# Altium PCB 60ghz radar_v1.1.PcbDoc (part 2 of 2)
Units mil, origin at the board's own origin, x right, y up, seen from the top; angles counter-clockwise.
Board outline 1181.1 x 787.4 mil, 4 copper layers (Top Layer, Mid Layer 1, Mid Layer 2, Bottom Layer), stack 61.811 mil thick; 64 components, 52 nets, 281 pads, 70 vias.
Unrouted connection lines stored in the file: 1.
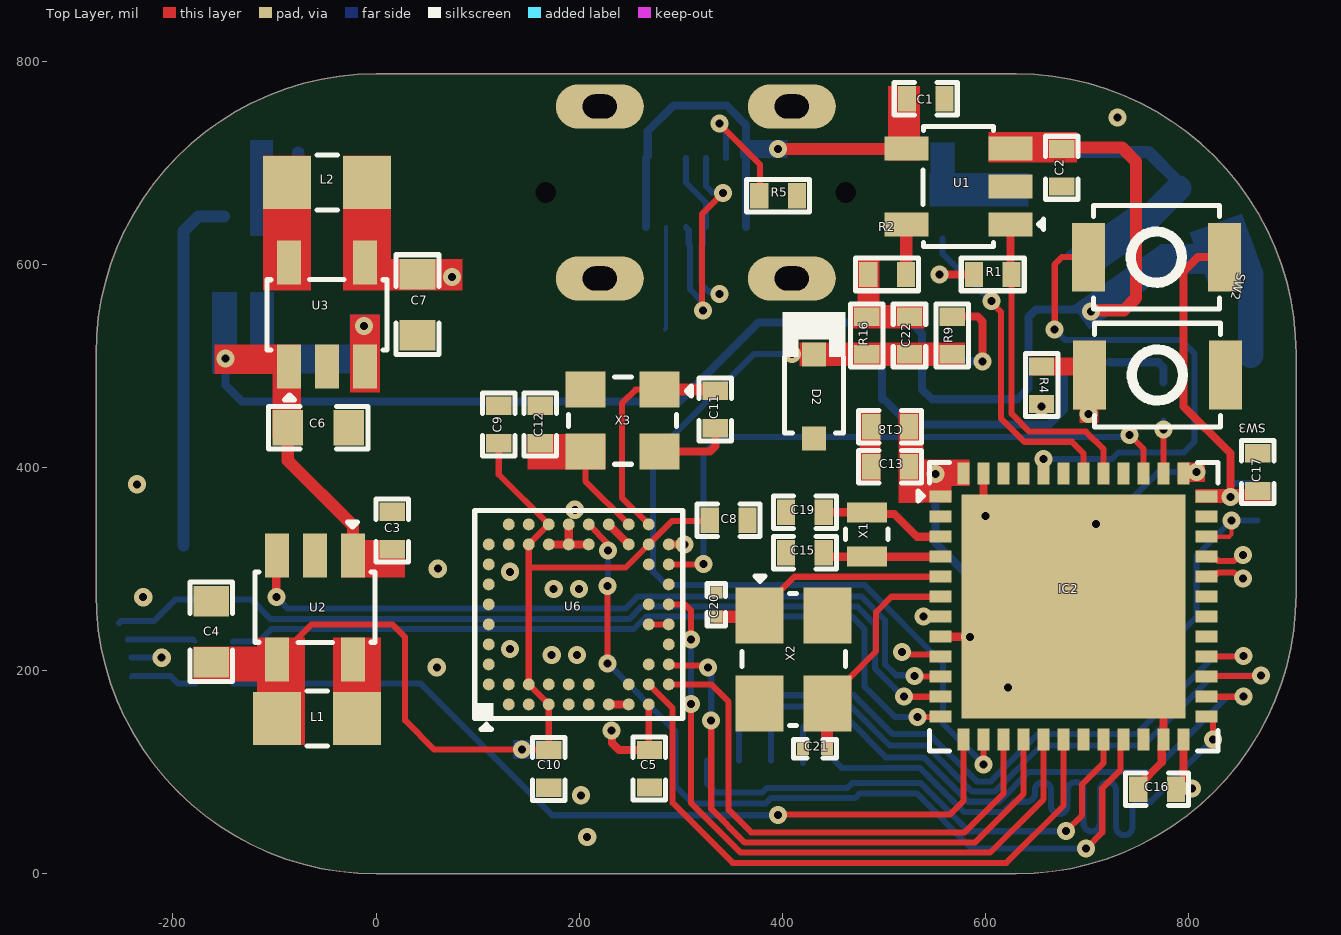
[diagram p0: Top Layer view]

## Part data (continued)
SW1: "SWITCH TACTILE SPST-NO 0.05A 12V", Actuator Color=Black, Case/Package=SMD/SMT, Contact Current Rating=50mA, Contact Resistance=500mR, LCSC Part Number=C79167, Manufacturer=Panasonic, Max Operating Temperature=70°C, Max Voltage Rating (DC)=12V, Min Operating Temperature=-20°C, Operating Force=2.2N, Package Quantity=5000, Supplier Part Number=667-EVQP7A01P, Actuator Length=0.65mm, Category="Tactile Switches", ComponentLink1Description=http://uk.rs-online.com/webdocs/13a5/0900766b813a5dbe.pdf?src-supplier=Rs, ComponentLink1URL=http://uk.rs-online.com/webdocs/13a5/0900766b813a5dbe.pdf?src-supplier=Rs, ComponentLink2Description=http://datasheet.octopart.com/EVQ-P7A01P-Panasonic-datasheet-98950114.pdf?src-supplier=Rs, ComponentLink2URL=http://datasheet.octopart.com/EVQ-P7A01P-Panasonic-datasheet-98950114.pdf?src-supplier=Rs, ComponentLink3Description=https://www3.panasonic.biz/ac/e_download/control/switch/light-touch/catalog/sw_lt_eng_3529s_side.pdf?src-supplier=Verical, ComponentLink3URL=https://www3.panasonic.biz/ac/e_download/control/switch/light-touch/catalog/sw_lt_eng_3529s_side.pdf?src-supplier=Verical, ComponentLink4Description=https://www3.panasonic.biz/ac/e_download/control/switch/light-touch/catalog/sw_lt_eng_3529s_side.pdf?src-supplier=Onlinecomponents.com, ComponentLink4URL=https://www3.panasonic.biz/ac/e_download/control/switch/light-touch/catalog/sw_lt_eng_3529s_side.pdf?src-supplier=Onlinecomponents.com, ComponentLink5Description=https://www3.panasonic.biz/ac/e_download/control/switch/light-touch/catalog/sw_lt_eng_3529s_side.pdf?src-supplier=Arrow+Electronics, ComponentLink5URL=https://www3.panasonic.biz/ac/e_download/control/switch/light-touch/catalog/sw_lt_eng_3529s_side.pdf?src-supplier=Arrow+Electronics, ComponentLink6Description=https://www3.panasonic.biz/ac/e_download/control/switch/light-touch/catalog/sw_lt_eng_3529s_side.pdf?src-supplier=Avnet, ComponentLink6URL=https://www3.panasonic.biz/ac/e_download/control/switch/light-touch/catalog/sw_lt_eng_3529s_side.pdf?src-supplier=Avnet, ComponentLink7Description=http://www.farnell.com/datasheets/1790605.pdf?src-supplier=Newark, ComponentLink7URL=http://www.farnell.com/datasheets/1790605.pdf?src-supplier=Newark, ComponentLink8Description=https://datasheet.octopart.com/EVQ-P7A01P-Panasonic-datasheet-98950114.pdf?src-supplier=Future+Electronics, ComponentLink8URL=https://datasheet.octopart.com/EVQ-P7A01P-Panasonic-datasheet-98950114.pdf?src-supplier=Future+Electronics, ComponentLink9Description=https://www3.panasonic.biz/ac/e_download/control/switch/light-touch/catalog/sw_lt_eng_3529s_side.pdf?src-supplier=Mouser, ComponentLink9URL=https://www3.panasonic.biz/ac/e_download/control/switch/light-touch/catalog/sw_lt_eng_3529s_side.pdf?src-supplier=Mouser, ComponentLink10Description=https://www3.panasonic.biz/ac/e_download/control/switch/light-touch/catalog/sw_lt_eng_3529s_side.pdf?src-supplier=Allied+Electronics, ComponentLink10URL=https://www3.panasonic.biz/ac/e_download/control/switch/light-touch/catalog/sw_lt_eng_3529s_side.pdf?src-supplier=Allied+Electronics, ComponentLink11Description=http://datasheet.octopart.com/EVQ-P7A01P-Panasonic-datasheet-98950114.pdf?src-supplier=Future+Electronics, ComponentLink11URL=http://datasheet.octopart.com/EVQ-P7A01P-Panasonic-datasheet-98950114.pdf?src-supplier=Future+Electronics, ComponentLink12Description=http://datasheet.octopart.com/EVQ-P7A01P-Panasonic-datasheet-98950114.pdf?src-supplier=Distrelec, ComponentLink12URL=http://datasheet.octopart.com/EVQ-P7A01P-Panasonic-datasheet-98950114.pdf?src-supplier=Distrelec, ComponentLink13Description=http://datasheet.octopart.com/EVQ-P7A01P-Panasonic-datasheet-98950114.pdf?src-supplier=Farnell, ComponentLink13URL=http://datasheet.octopart.com/EVQ-P7A01P-Panasonic-datasheet-98950114.pdf?src-supplier=Farnell, ComponentLink14Description=http://www.farnell.com/datasheets/1790605.pdf?src-supplier=Element14, ComponentLink14URL=http://www.farnell.com/datasheets/1790605.pdf?src-supplier=Element14, ComponentLink15Description=http://industrial.panasonic.com/www-data/pdf/ATK0000/ATK0000CE20.pdf?src-supplier=Farnell, ComponentLink15URL=http://industrial.panasonic.com/www-data/pdf/ATK0000/ATK0000CE20.pdf?src-supplier=Farnell, ComponentLink16Description=http://datasheet.octopart.com/EVQ-P7A01P-Panasonic-datasheet-98950114.pdf?src-supplier=Newark, ComponentLink16URL=http://datasheet.octopart.com/EVQ-P7A01P-Panasonic-datasheet-98950114.pdf?src-supplier=Newark, ComponentLink17Description=https://datasheet.octopart.com/EVQ-P7A01P-Panasonic-datasheet-22087671.pdf?src-supplier=Electro+Sonic, ComponentLink17URL=https://datasheet.octopart.com/EVQ-P7A01P-Panasonic-datasheet-22087671.pdf?src-supplier=Electro+Sonic, ComponentLink18Description=http://datasheet.octopart.com/EVQ-P7A01P-Panasonic-datasheet-98950114.pdf?src-supplier=Quest, ComponentLink18URL=http://datasheet.octopart.com/EVQ-P7A01P-Panasonic-datasheet-98950114.pdf?src-supplier=Quest, ComponentLink19Description=https://www3.panasonic.biz/ac/e_download/control/switch/light-touch/catalog/sw_lt_eng_3529s_side.pdf?src-supplier=TTI, ComponentLink19URL=https://www3.panasonic.biz/ac/e_download/control/switch/light-touch/catalog/sw_lt_eng_3529s_side.pdf?src-supplier=TTI, ComponentLink20Description=https://www3.panasonic.biz/ac/e_download/control/switch/light-touch/catalog/sw_lt_eng_3529s_side.pdf?src-supplier=NAC+Semi, ComponentLink20URL=https://www3.panasonic.biz/ac/e_download/control/switch/light-touch/catalog/sw_lt_eng_3529s_side.pdf?src-supplier=NAC+Semi, Electrical Life=100000Cycles, Illumination Type=Non-Illuminated, Item Type="Tactile Switch", Lead Free="Lead Free", Manufacturer Part Number=EVQ-P7A01P, Mechanical Life=100000Cycles, Mounting Technology="Surface Mount", Orientation="Right Angle", Packaging="Tape and Reel", Pricing="1=0.28, 10=0.258, 50=0.258, 100=0.213, 1000=0.169, 10000=0.133 (USD)", Radiation Hardening=No, Reach SVHC Compliant=Unknown, RoHS=Yes, Series=EVQP7, Stock=47904, Supplier=Mouser, Switch Function=Off-Mom, Switch Travel=0.2mm, Termination="Gull Wing", Throw Configuration=SPST
SW2 SW3: "SWITCH TACTILE SPST-NO 0.05A 12V", Contact Current Rating=50mA, Contact Resistance=100mR, Insulation Resistance=100MR, LCSC Part Number=C231329, Manufacturer=Omron, Max Operating Temperature=70°C, Max Voltage Rating (DC)=12V, Min Operating Temperature=-25°C, Operating Force=1.5N, Package Quantity=1, Ratings="Dust Proof,IP40", Supplier Part Number 1=SW1020DKR-ND, Actuator Length=0.4mm, Actuator Type=Standard, ComponentLink1Description=http://www.farnell.com/datasheets/60838.pdf?src-supplier=Farnell, ComponentLink1URL=http://www.farnell.com/datasheets/60838.pdf?src-supplier=Farnell, ComponentLink2Description=http://www.farnell.com/datasheets/60838.pdf?src-supplier=Element14, ComponentLink2URL=http://www.farnell.com/datasheets/60838.pdf?src-supplier=Element14, ComponentLink3Description=https://omronfs.omron.com/en_US/ecb/products/pdf/en-b3u.pdf?src-supplier=Digi-Key, ComponentLink3URL=https://omronfs.omron.com/en_US/ecb/products/pdf/en-b3u.pdf?src-supplier=Digi-Key, ComponentLink4Description=http://www.omron.com/ecb/products/pdf/en-b3u.pdf?src-supplier=Digi-Key, ComponentLink4URL=http://www.omron.com/ecb/products/pdf/en-b3u.pdf?src-supplier=Digi-Key, ComponentLink5Description=https://www.distrelec.biz/Web/Downloads/he/et/B3U_eng_datasheet.pdf?mime=application%2Fpdf&src-supplier=Distrelec, ComponentLink5URL=https://www.distrelec.biz/Web/Downloads/he/et/B3U_eng_datasheet.pdf?mime=application%2Fpdf&src-supplier=Distrelec, ComponentLink6Description=http://www.onlinecomponents.com/productFiles/mf-OM/en-b3u.pdf?src-supplier=Onlinecomponents.com, ComponentLink6URL=http://www.onlinecomponents.com/productFiles/mf-OM/en-b3u.pdf?src-supplier=Onlinecomponents.com, ComponentLink7Description=https://www.verical.com/server-webapp/html/getDatasheet?partID=552554&src-supplier=Verical, ComponentLink7URL=https://www.verical.com/server-webapp/html/getDatasheet?partID=552554&src-supplier=Verical, ComponentLink8Description=http://www.farnell.com/datasheets/1685550.pdf?src-supplier=Element14, ComponentLink8URL=http://www.farnell.com/datasheets/1685550.pdf?src-supplier=Element14, ComponentLink9Description=http://www.farnell.com/datasheets/2610940.pdf?src-supplier=Farnell, ComponentLink9URL=http://www.farnell.com/datasheets/2610940.pdf?src-supplier=Farnell, ComponentLink10Description=https://www.alliedelec.com/m/d/4c8a9ef82804fc3c241a13c1e298fd73.pdf?src-supplier=Allied+Electronics, ComponentLink10URL=https://www.alliedelec.com/m/d/4c8a9ef82804fc3c241a13c1e298fd73.pdf?src-supplier=Allied+Electronics, Contact Material=Silver, Current Rating=50mA, Depth=2.5mm, Electrical Life=200000Cycles, Height=1.2mm, Illumination Type=Non-Illuminated,Illuminated, Item Type=Switch, Lead Free="Lead Free", Length=4mm, Manufacturer Part Number=B3U-1000P, Max Current Rating=50mA, Mechanical Life=200000Cycles, Mount="Surface Mount", Orientation=Straight, Packaging="Tape and Reel", Pricing 1="1=1, 10=0.961, 25=0.9064, 50=0.7976, 100=0.7251, 250=0.68888, 500=0.67074, 1000=0.52571 (USD)", REACH SVHC=Unknown, Stock 1=116454, Supplier 1=Digi-Key, Switch Function=Off-Mom, Switch Travel=0.15mm, Termination=SMD/SMT, Throw Configuration=SPST, Voltage Rating (DC)=12V, Weight=0.000776oz, Width=3mm
TP TP1: "Wire Connecting Pad", Item Type="Test Point", Manufacturer Part Number="2 Test Pad"
U1: "IC BATT CNTL LI-ION 1CEL SOT23-5", Battery Pack Voltage=4.2V, Case/Package=SOT-23, Drain to Source Resistance=350mR, LCSC Part Number=C424093, Manufacturer=Microchip, Max Charge Current=500mA, Max Operating Temperature=85°C, Max Output Voltage=4.5V, Max Power Dissipation=1.54W, Max Supply Voltage=6V, Min Operating Temperature=-40°C, Min Output Voltage=4.168V, Min Supply Voltage=3.75V, Supplier Part Number=7386360, Voltage Rating=4.534V, Category="Battery Management", ComponentLink1Description=https://datasheet.ciiva.com/22828/0900766b80d2b53a-22828876.pdf?src-supplier=Rs, ComponentLink1URL=https://datasheet.ciiva.com/22828/0900766b80d2b53a-22828876.pdf?src-supplier=Rs, ComponentLink2Description=https://datasheet.ciiva.com/26344/651521-da-01-en-contr-mcp73831t-2aci-ot-sot-23-5-mcp-26344458.pdf?src-supplier=Conrad, ComponentLink2URL=https://datasheet.ciiva.com/26344/651521-da-01-en-contr-mcp73831t-2aci-ot-sot-23-5-mcp-26344458.pdf?src-supplier=Conrad, ComponentLink3Description=https://datasheet.ciiva.com/1137/630369-1137803.pdf?src-supplier=Element14, ComponentLink3URL=https://datasheet.ciiva.com/1137/630369-1137803.pdf?src-supplier=Element14, ComponentLink4Description=https://datasheet.ciiva.com/28626/630369-28626439.pdf?src-supplier=Element14, ComponentLink4URL=https://datasheet.ciiva.com/28626/630369-28626439.pdf?src-supplier=Element14, ComponentLink5Description=https://datasheet.ciiva.com/46385/630369-46385324.pdf?src-supplier=Element14, ComponentLink5URL=https://datasheet.ciiva.com/46385/630369-46385324.pdf?src-supplier=Element14, ComponentLink6Description=https://datasheet.ciiva.com/1144/630369-1144461.pdf?src-supplier=Newark, ComponentLink6URL=https://datasheet.ciiva.com/1144/630369-1144461.pdf?src-supplier=Newark, Fault Protection="Over Voltage", Height=1.3mm, Item Type=IC, Lead Free="Lead Free", Length=3.1mm, Manufacturer Part Number=MCP73831T-2ACI/OT, Mounting Technology="Surface Mount", Number of Cells=1, Number of Channels=1, Number of Outputs=1, Output Current=500mA, Output Voltage=4.2V, Packaging="Tape and Reel", Pins=5, Pricing="5=0.708, 25=0.684, 100=0.664 (GBP)", Radiation Hardening=No, Reach SVHC Compliant=No, RoHS=Yes, RoHS Compliant=Yes, Series=-, Stock=95, Supplier=Rs, Termination=SMD/SMT, Weight=0.00709oz, Width=1.8mm
U2: "IC REG BUCK 1.8V 600MA SOT23-5", Manufacturer="TI National Semiconductor", Supplier Part Number=926-LM3671MF-1.8NOPB, ComponentLink1Description=https://datasheet.ciiva.com/25627/0900766b810fa54f-25627509.pdf?src-supplier=Rs, ComponentLink1URL=https://datasheet.ciiva.com/25627/0900766b810fa54f-25627509.pdf?src-supplier=Rs, ComponentLink2Description=https://datasheet.ciiva.com/15113/getdatasheetpartid-147216-15113223.pdf?src-supplier=Verical, ComponentLink2URL=https://datasheet.ciiva.com/15113/getdatasheetpartid-147216-15113223.pdf?src-supplier=Verical, ComponentLink3Description=https://datasheet.ciiva.com/22687/1882649-22687462.pdf?src-supplier=Element14, ComponentLink3URL=https://datasheet.ciiva.com/22687/1882649-22687462.pdf?src-supplier=Element14, ComponentLink4Description=https://datasheet.ciiva.com/3220/lm3671-3220955.pdf?src-supplier=Avnet, ComponentLink4URL=https://datasheet.ciiva.com/3220/lm3671-3220955.pdf?src-supplier=Avnet, ComponentLink5Description=https://datasheet.ciiva.com/3220/lm3671-3220956.pdf?src-supplier=Avnet, ComponentLink5URL=https://datasheet.ciiva.com/3220/lm3671-3220956.pdf?src-supplier=Avnet, ComponentLink6Description=https://datasheet.ciiva.com/22756/1781731-22756527.pdf?src-supplier=Farnell, ComponentLink6URL=https://datasheet.ciiva.com/22756/1781731-22756527.pdf?src-supplier=Farnell, Item Type=IC, Manufacturer Part Number=LM3671MF-1.8/NOPB, Pricing="1=1.21, 10=1.07, 50=1.07, 100=0.962, 1000=0.766, 10000=0.703 (USD)", RoHS=Yes, Supplier=Mouser
U3: "IC REG BUCK 3.3V 600MA SOT23-5", Manufacturer="Texas Instruments", Supplier Part Number=926-LM3671MF-3.3NOPB, Category="Voltage Regulators - Switching", ComponentLink1Description=https://datasheet.ciiva.com/46382/1882649-46382616.pdf?src-supplier=Element14, ComponentLink1URL=https://datasheet.ciiva.com/46382/1882649-46382616.pdf?src-supplier=Element14, ComponentLink2Description=https://datasheet.ciiva.com/46425/1761249-46425739.pdf?src-supplier=Element14, ComponentLink2URL=https://datasheet.ciiva.com/46425/1761249-46425739.pdf?src-supplier=Element14, Item Type=IC, Manufacturer Part Number=LM3671MF-3.3/NOPB, Pricing="1=1.66, 10=1.41, 50=1.41, 100=1.2, 1000=0.815, 10000=0.703 (USD)", RoHS=Yes, Stock=4696, Supplier=Mouser
U4: "IC CNTRLR ON/OFF W/DEB TSOT23-6", Case/Package=SOT-23-6, LCSC Part Number=C79401, Manufacturer=Maxim, Max Operating Temperature=125°C, Max Power Dissipation=727W, Max Supply Voltage=5.5V, Min Operating Temperature=-40°C, Min Supply Voltage=2.7V, Number of Voltages Monitored=1, Operating Supply Current=7uA, Undervoltage Threshold=1.8V, Category="Interface ICs", ComponentLink1Description=https://datasheet.ciiva.com/4901/max16054-83881-4901086.pdf?src-supplier=Mouser, ComponentLink1URL=https://datasheet.ciiva.com/4901/max16054-83881-4901086.pdf?src-supplier=Mouser, ComponentLink2Description=https://datasheet.ciiva.com/1784/max16054-1784560.pdf?src-supplier=Digi-Key, ComponentLink2URL=https://datasheet.ciiva.com/1784/max16054-1784560.pdf?src-supplier=Digi-Key, ComponentLink3Description=https://datasheet.ciiva.com/14247/max16054-14247770.pdf?src-supplier=Avnet, ComponentLink3URL=https://datasheet.ciiva.com/14247/max16054-14247770.pdf?src-supplier=Avnet, ComponentLink4Description=https://datasheet.ciiva.com/1784/max16054-1784561.pdf?src-supplier=Digi-Key, ComponentLink4URL=https://datasheet.ciiva.com/1784/max16054-1784561.pdf?src-supplier=Digi-Key, ComponentLink5Description=https://datasheet.ciiva.com/1784/max16054-1784562.pdf?src-supplier=Digi-Key, ComponentLink5URL=https://datasheet.ciiva.com/1784/max16054-1784562.pdf?src-supplier=Digi-Key, Contact Plating=Tin,Matte, Height=0.73mm, Item Type=IC, Length=4mm, Manufacturer Part Number=MAX16054AZT+T, Mounting Technology="Surface Mount", Output Type=PUSH-PULL, Package Quantity=1, Packaging="Tape and Reel", Pins=6, Pricing 1="1=2.99700 (USD)", Radiation Hardening=No, RoHS=Yes, RoHS Compliant=Yes, Series=-, Stock 1=3, Supplier 1="Arrow Electronics", Supplier Part Number 1=MAX16054AZT+T, Watchdog Timer=No, Width=4mm
U6: "RADAR SENSOR SYSTEM-IN-PACKAGE B", Manufacturer=Acconeer, Supplier Part Number=925-A121-001-T&R, Category=LDO, Item Type=IC, Manufacturer Part Number=A121-001-T&R, Pricing="1=13.72, 10=11.57, 50=10.22, 100=8.78, 1000=7.74, 10000=6.41 (USD)", RoHS=No, Stock=7442, Supplier=Mouser
X1: library part ECS-.327-12.5-16-TR, "CRYSTAL 32.7680KHZ 12.5PF SMD", Manufacturer="ECS International", Category=Crystals, ComponentLink1Description=https://datasheet.octopart.com/ECS-.327-12.5-16-TR-ECS-International-datasheet-14433430.pdf?src-supplier=Future+Electronics, ComponentLink1URL=https://datasheet.octopart.com/ECS-.327-12.5-16-TR-ECS-International-datasheet-14433430.pdf?src-supplier=Future+Electronics, ComponentLink2Description=http://www.ecsxtal.com/store/pdf/ECX-16.pdf?src-supplier=Digikey, ComponentLink2URL=http://www.ecsxtal.com/store/pdf/ECX-16.pdf?src-supplier=Digikey, ComponentLink3Description=http://www.ecsxtal.com/store/pdf/partnumber4.pdf?src-supplier=Digikey, ComponentLink3URL=http://www.ecsxtal.com/store/pdf/partnumber4.pdf?src-supplier=Digikey, ComponentLink4Description=https://datasheet.octopart.com/ECS-.327-12.5-16-TR-ECS-International-datasheet-130008819.pdf?src-supplier=Master+Electronics, ComponentLink4URL=https://datasheet.octopart.com/ECS-.327-12.5-16-TR-ECS-International-datasheet-130008819.pdf?src-supplier=Master+Electronics, Item Type=Crystal, Manufacturer Part Number=ECS-.327-12.5-16-TR, Pricing="5000=0.403 (USD)", RoHS=Yes, Stock=20000, Supplier=Avnet, Supplier Part Number=ECS-.327-12.5-16-TR
X2: library part ECS-80-12-33-JGN-TR, "CRYSTAL 8.0000MHZ 12PF SMD", Manufacturer="ECS International", ComponentLink1Description=https://datasheet.octopart.com/ECS-80-12-33-JGN-TR-ECS-International-datasheet-140089731.pdf?src-supplier=Future+Electronics, ComponentLink1URL=https://datasheet.octopart.com/ECS-80-12-33-JGN-TR-ECS-International-datasheet-140089731.pdf?src-supplier=Future+Electronics, ComponentLink2Description=https://datasheet.octopart.com/ECS-80-12-33-JGN-TR-ECS-International-datasheet-17018741.pdf?src-supplier=Master+Electronics, ComponentLink2URL=https://datasheet.octopart.com/ECS-80-12-33-JGN-TR-ECS-International-datasheet-17018741.pdf?src-supplier=Master+Electronics, Item Type=Crystal, Manufacturer Part Number=ECS-80-12-33-JGN-TR, Pricing="1000=0.27283 (USD)", RoHS=No, RoHS Compliant=Yes, Stock=58000, Supplier=Avnet, Supplier Part Number=ECS-80-12-33-JGN-TR
X3: "CRYSTAL 24.0000MHZ 8PF SMD", Manufacturer="ECS Inc.", Package=None, Item Type=Crystal, Manufacturer Part Number=ECS-240-8-36-RWN-TR3

## Free pads (board coordinates)
  round 50 smd far side: 23(743.79,259.38) 24(746.79,192.38) 25(676.79,259.38) 26(676.79,193.38)

## Via types
v1: diameter 17.72, hole 7.87, Top Layer to Bottom Layer, tented both sides, 37 vias
v2: diameter 18, hole 7.87, Top Layer to Bottom Layer, tented both sides, 19 vias
v3: diameter 17.72, hole 7.87, Top Layer to Bottom Layer, 14 vias

## Nets (pads, with @x,y where several pads share a name; then routed paths per layer and width w, separated by ;. In a path a pad name is that pad's centre, name@x,y a point inside that pad or via, vN(x,y) a via of type N, cw(c..) or ccw(c..) an arc to the next point about the centre after c; other vN are vias at no path point)
3.3V: C5.2 C7.2 C13.1 C16.1 C17.1 C18.1 IC2.1 IC2.9 IC2.24 IC2.36 IC2.48 J12.8 L2.2 LED1.2 pad.25 R1.2 R4.1 R15.1 SW2.2 U3.4 U6.J1 U6.K9 | length 3638.8
  Top Layer w6: C5.2@268.39,127.23 U6.J1 ; v1(517.79,218.38) 520.03,216.14 553.28,216.14 IC2.9
  Top Layer w8: L2.2@-13.73,680.38 L2.2@-10.81,677.46 ; C7.2@39.94,591.74 C7.2@44.3,587.38 ; v1(231.79,141.38) 232.14,141.03 232.14,128.86 238.96,122.04 C5.2 ; U6.K9 U6.K9 303.73,324.32 v1(303.79,324.38) ; v3(554.5,590) R1.2 ; v3(655,460.14) R4.1 ; C16.1@787.29,79.88 C16.1 787.29,86.88 794.85,94.44 IC2.24@794.85,127.13 ; IC2.36@822.41,371.22 822.52,371.11 840.89,371.11 v1(841,371) 841,413.99 794.85,460.14 794.85,592.85 809,607 SW2.2
  Mid Layer 1 w8: v2(-211,212.76) -140.48,142.24 230.93,142.24 v1(231.79,141.38) 267,176.59 267,303.59 286.79,323.38 302.79,323.38 v1(303.79,324.38) ; v3(554.5,590) 516.5,628 115.41,628 v1(74.79,587.38) 120.79,541.38 303.79,358.38 v1(303.79,324.38) ; v3(655,460.14) 617.55,460.14 v1(550.79,393.38) 534.09,393.38 ; v1(841,371) 839.92,371 803,334.08 v1(803,84) 678,84 543.62,218.38 v1(517.79,218.38) 517.79,377.07 534.09,393.38 ; v1(303.79,324.38) 373.79,324.38 442.79,393.38 534.09,393.38
  Bottom Layer w4: LED1.2 LED1.2@-240.67,212.95
  Bottom Layer w6: LED1.2@-240.67,212.95 v2@-211,212.95 ; v1(841,371) 841,381.38 844.12,384.5 R15.1
  Bottom Layer w8: v1(550.79,393.38) 550.79,325.7 617.11,259.38 pad.25
+1.8V: C4.2 C8.1 C9.1 C10.1 J12.10 L1.2 U2.4 U6.C2 U6.C9 U6.D1 U6.D10 U6.J9 | length 930.9
  Top Layer w6: U2.4 -97.61,212.19 -87.8,222 -86.81,222 -63.29,245.52 16,245.52 28.5,233.02 28.5,151.17 57.29,122.38 v1(143.79,122.38) 169.29,122.38 C10.1 ; C9.1 120.79,393.12 U6.D10 U6.C9 150.28,301.38 ; C10.1@169.79,126.38 169.96,126.55 U6.D1 U6.C2 150.28,301.38 ; C8.1@328.5,347.38 291.5,347.38 245.5,301.38 150.28,301.38
  Bottom Layer w4: J12.10@167.75,111.38 J12.10@168.06,111.69
  Bottom Layer w6: J12.10@161.21,126.38 168.06,119.54 J12.10@168.06,111.69
BAT+: C2.2 C3.2 C6.2 C14.2 D1.2 Q1.2 R12.1 TP1.1 TP.1 U1.3 U2.1 U3.1 U4.6 | length 1648
  Top Layer w8: C6.2@-87.72,454.38 C6.2@-85.61,456.49 ; U3.1@-87.26,507.38 U3.1@-85.61,509.02 ; U1.3@617.04,713.83 U1.3@619.86,711
  Top Layer w12: C6.2@-87,446 C6.2 -87,407 -22.81,342.81 U2.1 ; 646.31,715 734.11,715 748.09,701.02 748.09,566.75 736.1,554.76 704.68,554.76 v3(703.59,553.67) ; C2.2 C2.2@676.5,713.5
  Bottom Layer w4: D1.2 D1.2@733.41,569.65 ; C14.2@761.6,597.85 C14.2
  Bottom Layer w8: v1(-148.21,507.38) -148.21,481.11 -131.97,464.87 298.66,464.87 376.59,542.79 R12.1 497.22,542.79 Q1.2 527.42,541.95 537.43,531.94 537.43,476.8 547.08,467.15 631.11,467.15 642,478.04 642,547.99 649.61,555.59 701.66,555.59 v3(703.59,553.67)
  Bottom Layer w25: TP1.1 860.79,590.56 TP.1
BLUE: IC2.13 R7.2 | length 834
  Top Layer w6: v1(395.63,57.73) 396.28,58.38 564.79,58.38 578.31,71.91 IC2.13@578.31,127.13
  Bottom Layer w6: R7.2 43.88,187.29 173.43,57.73 v1(395.63,57.73)
BOOT0: IC2.44 R3.1 SW2.1 | length 504.9
  Top Layer w6: v3(656.83,408.47) 656.94,408.36 656.94,393.97 IC2.44 ; v3(667.96,535.69) 667.96,599.95 675,607 SW2.1
  Bottom Layer w6: v3(656.83,408.47) 724.35,408.47 730.65,414.76 795,414.76 805.51,425.27 805.51,512.29 798.44,519.36 792.44,525.36 R3.1 678.28,525.36 v3(667.96,535.69)
CHRG: IC2.41 R1.1 U1.1 | length 315.8
  Top Layer w6: R1.1 625.5,452.92 643.1,435.33 698.73,435.33 716.11,417.94 IC2.41
  Top Layer w8: U1.1 624.28,591.22 R1.1
EN_1.8V: IC2.10 U2.3 | length 758.1
  Top Layer w4: U2.3@-98.21,312.96 U2.3
  Top Layer w6: v1(529.79,194.65) 530.09,194.35 550.46,194.35 IC2.10@550.76,194.06
  Top Layer w8: v1(-98.21,272.38) U2.3@-98.21,312.96
  Bottom Layer w6: v1(-98.21,272.38) -87.21,261.38 245.65,261.38 257.49,273.22 477.5,273.22 500.93,249.79 500.93,206.38 511.8,195.51 528.93,195.51 v1(529.79,194.65)
EN_3.3V: U3.3 U4.5 | length 1.6
  Top Layer w6: v1(-11.65,539.36) v1@-11.23,538.94 ; U3.3@-11.23,509.44 U3.3@-10.81,509.02
  Bottom Layer w12: U4.5 U4.5@-112.22,553.28
ENABLE_RADAR: IC2.21 J12.6 U6.F10 | length 848.7
  Top Layer w6: U6.F10 228.22,325.06 v1(228.22,318.37) ; v1(227.82,207.28) v1(227.79,283.38) ; v1(698.79,24.83) 714.79,40.83 714.79,84.24 732.89,102.34 732.89,124.22 IC2.21@735.8,127.13
  Bottom Layer w6: v1(227.79,283.38) 228.22,283.81 v1(228.22,318.37) ; v1(227.82,207.28) 294.65,140.44 294.65,86.52 311.79,69.38 383.43,69.38 388.65,74.59 471.45,74.59 476.18,79.32 532.03,79.32 586.52,24.83 v1(698.79,24.83)
GND: C1.1 C2.1 C3.1 C4.1 C5.1 C6.1 C7.1 C8.2 C9.2 C10.2 C11.1 C12.1 C13.2 C15.2 C16.2 C17.2 C18.2 C19.2 C20.1 C21.1 C22.2 D2.1 IC2.8 IC2.23 IC2.35 IC2.47 IC2.49 J1.A1 J1.A12 J1.B1 J1.B12 J1.S1 J1.S2 J1.S3 J1.S4 J12.9 J12.S1 pad.26 Q2.2 Q3.2 R2.1 R3.2 R5.2 R6.1 R8.1 R10.2 R13.1 R16.1 SW1.2 SW3.2 TP.2 U1.2 U2.2 U3.2 U4.2 U6.A2 U6.A3 U6.A4 U6.A5 U6.A6 U6.A7 U6.A8 U6.A9 U6.B2 U6.B9 U6.B10 U6.C1 U6.C10 U6.D2 U6.D9 U6.E1 U6.E2 U6.E9 U6.E10 U6.F1 U6.F2 U6.F9 U6.G1 U6.G10 U6.H1 U6.H2 U6.H9 U6.J3 U6.J5 U6.J6 U6.J8 U6.K4 U6.K5 U6.K7 X2.2 X2.4 X3.2 X3.4 | length 398.3
  Top Layer w6: U6.J5 U6.K5
  Top Layer w8: U6.D9 U6.E9 ; U6.E10 U6.E9 ; U6.F9 U6.E9 ; U6.G1 U6.H1 ; U6.G10 U6.H9 ; X3.4 328.5,415.71 334,421.21 C11.1 ; IC2.8 582.74,233.43 IC2.49@584.79,231.38 ; IC2.47 598,366.17 IC2.49@599.79,364.38 ; C16.2 750.29,86.88 773.26,109.85 773.26,125.22 775.17,127.13 775.17,203.76 IC2.49@779.79,208.38
  other v2: 207.79,36.38 201.79,77.38 621.79,183.38 59.79,203.38 172.79,215.38 197.79,215.38 131.79,221.38 584.79,233.38 -229.21,272.38 174.79,280.38 199.79,280.38 131.79,297.38 60.79,300.38 708.79,344.38 599.79,352.38 195.62,358.38 -235.21,383.38 729.79,744.38
GREEN: IC2.11 R18.2 | length 767
  Top Layer w6: v1(519.54,174.37) IC2.11@550.75,174.37
  Bottom Layer w6: R18.2 -122.58,269.88 -103.54,250.84 249.25,250.84 261.63,263.22 473.36,263.22 490.93,245.65 490.93,202.24 518.79,174.37 v1(519.54,174.37)
INTERRUPT: IC2.39 U6.K8 | length 608.6
  Top Layer w6: U6.K8 321.53,304.58 v1(322.18,305.23) ; v1(741.7,432) 755.48,418.22 IC2.39@755.48,398.78
  Bottom Layer w6: v1(322.18,305.23) 322.18,413.18 339,430 739.7,430 v1(741.7,432)
"INTERRUPT 2": IC2.20 J12.5 | length 503.7
  Top Layer w6: v1(679,42) 694.93,57.93 694.93,88.16 716.11,109.34 IC2.20@716.11,127.13
  Bottom Layer w6: J12.5@325.54,111.69 325.54,89.04 334.46,80.12 380.03,80.12 384.63,84.72 463.98,84.72 468.58,89.32 536.17,89.32 583.49,42 v1(679,42)
MOT-: C14.1 D1.1 Q3.3 TP1.2 | length 194
  Bottom Layer w4: C14.1@742.38,626.15 C14.1 C14.1@744.39,629.44 ; TP1.2@789.99,675.04 TP1.2
  Bottom Layer w12: Q3.3 760.16,710.52 TP1.2
  Bottom Layer w25: C14.1@744.39,629.44 TP1.2@789.99,675.04
NetC15_1: C15.1 IC2.4 X1.1 | length 116.8
  Top Layer w4: C15.1 C15.1@444.33,312.17
  Top Layer w8: C15.1@444.33,312.17 483,312.17 IC2.4
NetC19_1: C19.1 IC2.3 X1.2 | length 125.2
  Top Layer w4: X1.2@481.01,356 X1.2@481.35,355.65
  Top Layer w8: C19.1 X1.2@481.01,356 ; X1.2@481.35,355.65 482.76,354.25 510,354.25 532.39,331.85 IC2.3
NetC20_2: C20.2 IC2.5 X2.1 | length 233.2
  Top Layer w4: X2.1@376.42,253.19 X2.1
  Top Layer w6: X2.1@375.57,256.28 411.77,292.48 IC2.5@550.76,292.48
  Top Layer w12: C20.2 X2.1@376.42,253.19
NetC21_2: C21.2 IC2.6 X2.3 | length 236.1
  Top Layer w4: X2.3@443.81,167.04 X2.3
  Top Layer w6: X2.3@446.24,150.52 464.89,169.17 464.89,192.06 465.09,192.25 492.06,219.21 492.06,257.65 507.2,272.8 IC2.6@550.76,272.8
  Top Layer w12: C21.2 X2.3@443.81,167.04
NetJ1_A5: J1.A5 R5.1 | length 123.9
  Top Layer w6: v1(337.79,738.38) 377.79,698.38 R5.1@377.79,667.38
  Bottom Layer w4: v1@337.79,735.92 v1(337.79,738.38)
  Bottom Layer w6: v1@337.79,735.92 344.25,729.45 J1.A5
NetJ1_B5: J1.B5 R6.2 | length 100.9
  Bottom Layer w4: R6.2 285.2,536.7 J1.B5
NetL1_1: L1.1 U2.5
NetL2_1: L2.1 U3.5 | length 4.1
  Top Layer w8: L2.1@-85.61,677.46 L2.1@-82.7,680.38
NetLED1_1: LED1.1 R7.1 | length 67.2
  Bottom Layer w4: LED1.1 LED1.1@-239.66,194.82
  Bottom Layer w6: LED1.1@-239.66,194.82 -202.4,194.82 -194.87,187.29 R7.1
NetLED1_3: LED1.3 R17.1 | length 68.4
  Bottom Layer w4: LED1.3 LED1.3@-244,230.64 ; R17.1@-180.02,230.64 R17.1
  Bottom Layer w6: LED1.3@-244,230.64 R17.1@-180.02,230.64
NetLED1_4: LED1.4 R18.1 | length 84.3
  Bottom Layer w6: LED1.4 -251.12,248.73 -218.78,248.73 -197.63,269.88 R18.1
NetQ1_1: Q1.1 Q2.3 R12.2 | length 304
  Bottom Layer w8: R12.2 489.99,505.79 498.06,497.72 Q1.1 500.03,467.15 524.9,442.28 662.4,442.28 676.81,456.7 Q2.3
NetQ1_3: Q1.3 R9.2 | length 91.1
  Top Layer w8: R9.2 592.17,548.5 596.86,543.81 v3(596.86,504.55)
  Bottom Layer w8: Q1.3 v3(596.86,504.55)
NetQ2_1: Q2.1 R14.2 | length 70
  Bottom Layer w8: Q2.1 769.87,503.63 775,498.5 R14.2
NetQ3_1: Q3.1 R11.2 R13.2
NetR2_2: R2.2 U1.5 | length 49.2
  Top Layer w4: R2.2 R2.2@521.91,590.41
  Top Layer w12: R2.2@521.91,590.41 U1.5
NetR8_2: R8.2 U4.3 | length 63.3
  Bottom Layer w4: U4.3@-76.5,649.08 U4.3
  Bottom Layer w12: U4.3@-76.5,649.08 R8.2
NetSW1_1: SW1.1 U4.1 | length 355.2
  Bottom Layer w12: SW1.1@-189.46,323.13 -189.46,464.87 -189.46,632.54 -174.98,647.02 U4.1@-149.62,647.02
RED: IC2.12 R17.2 | length 776.1
  Top Layer w6: v1(532.79,154.38) 550.45,154.38 IC2.12@550.76,154.69
  Bottom Layer w6: R17.2 -115.35,228.59 -103.09,240.84 253.4,240.84 265.77,253.22 468.5,253.22 480.93,240.79 480.93,184.24 510.79,154.38 v1(532.79,154.38)
RST: IC2.7 R4.2 SW3.1 | length 386.5
  Top Layer w6: v3(538.89,253.19) v3(538.89,253.19) 555.64,253.15 IC2.7 ; v3(701.07,452.5) 701.07,490 SW3.1
  Mid Layer 1 w6: v3(538.89,253.19) 538.89,340.89 581,383 690.69,383 701.07,393.38 v3(701.07,452.5)
SPI_CLK: IC2.15 U6.K2 | length 516.1
  Top Layer w6: U6.K2 330.05,186.47 346.91,169.61 346.91,137.23 347,137.15 347,63 369.13,40.87 579.28,40.87 617.68,79.28 IC2.15@617.68,127.13
SPI_CLK2: IC2.26 J12.2 | length 578.5
  Top Layer w6: IC2.26@822.41,174.37 v1(853.79,174.38)
  Bottom Layer w6: J12.2 420.24,144.18 427.17,151.11 465.51,151.11 502.24,114.38 539.39,114.38 582.73,71.04 613.27,71.04 642.61,100.38 644.96,100.38 754.31,100.38 759.18,100.38 763.79,100.38 837.79,174.38 843.12,174.38 v1(853.79,174.38)
SPI_MISO: IC2.16 U6.K3 | length 569.8
  Top Layer w6: U6.K3 289.18,205.04 324.99,205.04 v1(326.65,203.38) ; v1(329.86,151.11) 329.86,63.97 362.95,30.87 589.28,30.87 637.37,78.96 IC2.16@637.37,127.13
  Bottom Layer w6: v1(326.65,203.38) 326.65,200.21 329.86,197 v1(329.86,151.11)
SPI_MISO2: IC2.27 J12.3 | length 661.8
  Top Layer w6: IC2.27@822.41,194.06 823.07,194.72 870.13,194.72 v1(870.79,195.38)
  Bottom Layer w6: J12.3@388.53,111.69 388.53,157 396.35,164.82 467.22,164.82 505.66,126.38 541.53,126.38 586.87,81.04 609.12,81.04 654.47,126.38 755,126.38 824,195.38 v1(870.79,195.38)
SPI_MOSI: IC2.17 U6.K6 | length 656.5
  Top Layer w6: U6.K6 303.88,265.21 309.79,259.3 v1(309.79,230.52) ; v1(309.79,167.38) 309.79,69.9 358.81,20.87 604.28,20.87 657.05,73.65 IC2.17@657.05,127.13
  Bottom Layer w6: v1(309.79,167.38) v1(309.79,230.52)
SPI_MOSI2: IC2.28 J12.4 | length 672.7
  Top Layer w6: IC2.28@822.41,213.74 822.73,214.06 853.47,214.06 v1(853.79,214.38)
  Bottom Layer w6: J12.4@357.03,111.69 357.03,165.41 367.45,175.84 470.34,175.84 508.66,137.52 544.53,137.52 591.02,91.04 604.98,91.04 651.47,137.52 748.26,137.52 825.12,214.38 v1(853.79,214.38)
SPI_SS: IC2.18 U6.J2 | length 618.7
  Top Layer w6: U6.J2 291.93,162.92 291.93,69.98 351.04,10.87 620.28,10.87 676.74,67.33 IC2.18@676.74,127.13
SPI_SS2: IC2.25 J12.1 | length 662.9
  Top Layer w6: IC2.25@822.41,154.69 823.79,153.31 v1(823.79,132.38)
  Bottom Layer w6: J12.1@451.52,111.69 451.52,111.22 458.36,104.38 535.25,104.38 573.87,65.76 578.59,61.04 617.41,61.04 627.41,71.04 640.41,71.04 ccw(c640.41,79.04) 648.41,79.04 648.41,82.38 cw(c656.41,82.38) 664.41,82.38 664.41,66.86 ccw(c672.41,66.86) 680.41,66.86 680.41,82.38 cw(c688.41,82.38) 696.41,82.38 696.41,49.69 ccw(c704.41,49.69) 712.41,49.69 712.41,82.38 cw(c720.41,82.38) 728.41,82.38 728.41,46.06 ccw(c736.41,46.06) 744.41,46.06 744.41,63.04 cw(c752.41,63.04) 752.41,71.04 762.45,71.04 783.41,92.01 v1(823.79,132.38)
SWCLK: IC2.37 pad.23 R10.1 | length 184.6
  Bottom Layer w4: R10.1 v1(807.5,395.5)
  Bottom Layer w6: pad.23 743.79,369.41 769.87,395.5 R10.1
SWDIO: IC2.34 pad.24 R15.2 | length 260.6
  Top Layer w4: IC2.34 839.83,331.85 842.17,334.19 v1(842.17,348)
  Bottom Layer w4: R15.2@867.5,348 R15.2
  Bottom Layer w6: pad.24 807.5,253.09 807.5,313.33 v1(842.17,348) R15.2@867.5,348
USB_N: IC2.32 J1.A7 J1.B7 | length 1161.5
  Top Layer w6: IC2.32 820.39,295.39 827.64,295.39 828.83,296.57 844.49,296.57 850.1,290.97 v3(853.27,290.97)
  Mid Layer 1 w4.2: v3(337.79,570.71) 339.53,568.97 339.53,498.62 355.15,483 442.79,483 444.89,483 ccw(c444.89,490.1) 451.99,490.1 451.99,523.21 cw(c459.09,523.21) 459.09,530.31 cw(c459.09,523.21) 466.2,523.21 466.2,490.1 ccw(c473.3,490.1) 473.3,483 ccw(c473.3,490.1) 480.4,490.1 480.4,511.76 cw(c487.5,511.76) 487.5,518.86 cw(c487.5,511.76) 494.61,511.76 494.61,490.1 ccw(c501.71,490.1) 501.71,483 517.5,483 519.96,483 522.26,485.3 852.71,485.3 883.77,454.25 886.46,451.55 886.46,309.45 874.74,297.72 862.49,297.72 855.73,290.97 v3(853.27,290.97)
  Bottom Layer w6: J1.A7 304.88,680.51 324.57,660.83 J1.B7 321.66,633.71 321.66,620.16 320.47,618.97 320.47,580.09 327.61,572.95 335.55,572.95 v3(337.79,570.71)
USB_P: IC2.33 J1.A6 J1.B6 | length 1096.1
  Top Layer w6: v3(321.72,554.65) 320.93,555.44 320.93,649.55 v1(341.34,669.96) ; IC2.33 820.39,309.26 827.64,309.26 828.83,308.07 844.49,308.07 850.1,313.68 v3(853.27,313.68)
  Mid Layer 1 w4.2: v3(321.72,554.65) 321.72,553.83 330.12,545.43 330.12,495.01 351.33,473.8 524.4,473.8 526.7,476.1 848.9,476.1 877.26,447.74 877.26,313.26 870.93,306.93 862.49,306.93 855.73,313.68 v3(853.27,313.68)
  Bottom Layer w6: J1.B6 307.79,633.71 307.79,620.16 308.97,618.97 308.97,575.33 319.48,564.82 319.48,556.89 v3(321.72,554.65) ; J1.A6@324.79,704.5 J1.A6 324.57,677.09 330.73,670.93 340.37,670.93 v1(341.34,669.96)
VBAT_ADC: C22.1 D2.2 IC2.14 R9.1 R16.2 | length 772.4
  Top Layer w6: v3(409.61,511.9) 430.44,511.9 D2.2 ; v1(598,107.9) IC2.14@598,127.13
  Bottom Layer w6: v3(409.61,511.9) 372.37,511.9 272.6,412.13 272.6,297.38 285.6,284.38 480.51,284.38 558,206.89 558,147.9 v1(598,107.9)
VBAT_ADC_EN: IC2.38 R14.1 | length 52.6
  Top Layer w6: v3(775,437.5) 775.08,437.42 IC2.38@775.08,393.96
  Bottom Layer w4: R14.1 R14.1@775.07,446.43
  Bottom Layer w6: v3(775,437.5) 775.07,437.57 R14.1@775.07,446.43
VIBRO: IC2.42 R11.1 | length 317.2
  Top Layer w6: v1(605.62,564.06) 605.62,562.54 615.04,553.13 615.04,448.44 638.16,425.33 684.81,425.33 696.43,413.71 IC2.42
  Bottom Layer w6: R11.1@557.46,625.41 557.46,610.88 604.28,564.06 v1(605.62,564.06)
VUSB: C1.2 J1.A4 J1.A9 J1.B4 J1.B9 U1.4 | length 437.1
  Top Layer w4: U1.4@521.46,713.38 U1.4
  Top Layer w12: v1(395.79,713.38) U1.4@521.46,713.38
  Bottom Layer w8: J1.B4 J1.A9 267.42,706.63 267.42,731.01 292.65,756.24 345.18,756.24 357.91,743.52 357.91,743.03 363.94,737 J1.A4 J1.B9
XIN: C11.2 U6.J10 X3.1 | length 228.4
  Top Layer w6: U6.J10 241.89,370.44 241.89,463.07 255.56,476.73 X3.1 ; C11.2@332.77,476.73 C11.2
  Top Layer w12: X3.1 C11.2@332.77,476.73
XOUT: C12.2 U6.H10 X3.3 | length 89.4
  Top Layer w6: X3.3 206.08,386.57 U6.H10
pads on no net: IC2.2 IC2.19 IC2.22 IC2.29 IC2.30 IC2.31 IC2.40 IC2.43 IC2.45 IC2.46 J1. J1.A8 J1.B8 J12.7 J12.S2 U4.4 U6.B1

## Polygon pours and split planes (outlines as drawn)
GND on Mid Layer 1 "NONET_L02_P000" (solid, shelved, pour order 0): -275.59,275.59 -275.59,511.81 cw(c0,511.81) 0,787.4 629.92,787.4 cw(c629.92,511.81) 905.51,511.81 905.51,275.59 cw(c629.92,275.59) 629.92,0 0,0 cw(c0,275.59)
GND on Mid Layer 2 "NONET_L03_P001" (solid, shelved, pour order 1): -275.59,275.59 -275.59,511.81 cw(c0,511.81) 0,787.4 629.92,787.4 cw(c629.92,511.81) 905.51,511.81 905.51,275.59 cw(c629.92,275.59) 629.92,0 0,0 cw(c0,275.59)
GND on Bottom Layer "NONET_L04_P002" (solid, shelved, pour order 2): -275.59,275.59 -275.59,511.81 cw(c0,511.81) 0,787.4 629.92,787.4 cw(c629.92,511.81) 905.51,511.81 905.51,275.59 cw(c629.92,275.59) 629.92,0 0,0 cw(c0,275.59)
GND on Top Layer "NONET_L01_P003" (solid, shelved, pour order 3): -275.59,275.59 -275.59,511.81 cw(c0,511.81) 0,787.4 629.92,787.4 cw(c629.92,511.81) 905.51,511.81 905.51,275.59 cw(c629.92,275.59) 629.92,0 0,0 cw(c0,275.59)

## Other copper
Top Layer:
  rectangle net SWCLK: 788.93,385.88 816,404.96
  rectangle net RST: 642.5,490.5 718.21,508.5
  rectangle net RST: 692.31,444 711,501
  rectangle net RST: 685.93,457.14 718.21,468.49
  rectangle net GND: 476,386 496.5,455
  rectangle net 3.3V: 806.66,365 880.29,379
  rectangle net GND: 474,537 495.5,605
  rectangle net GND: 469,537 540,560
  rectangle net VBAT_ADC: 417,500 579.5,523
  rectangle net +1.8V: -117.27,127.02 -70.06,232.85
  rectangle net BAT+: 602.62,700 690,730
  rectangle net BAT+: -34.62,291.91 28.5,328.5
  rectangle net 3.3V: 514,365 538.89,455
  rectangle net 3.3V: 545.56,382 584.22,408
  rectangle net 3.3V: 514,365.32 566.5,408
  rectangle net VUSB: 504,702.02 535.15,775.5
  rectangle net XOUT: 149.29,397.99 225.76,432.88
  rectangle net NetL2_1: -111.2,574 -63.96,707
  rectangle net EN_3.3V: -25.83,474 4,550.38
  rectangle net 3.3V: -32.46,574 85,605.38
  rectangle net 3.3V: -32.46,574 14.78,707
  region net BAT+: -74,492 -74,521 -159,521 -159,492
  rectangle net BAT+: -102,428.5 -73.8,520.85
  rectangle net NetL1_1: -42.46,127.02 4.74,232.85
  rectangle net +1.8V: -179.71,189.54 -85.8,224
Bottom Layer:
  rectangle net +1.8V: 135,113 179,132
  region net BAT+: 871.1,598.71 852.44,649.99 800.76,631.18 819.42,579.9
  rectangle net BAT+: 771.26,590.56 860.79,620
  region net BAT+: 787.66,595.87 771.26,619.28 685.32,559.1 701.72,535.69
  region net MOT-: 765,629.51 745.03,658.03 678.49,611.44 698.46,582.92
  rectangle net VUSB: 358,704.73 405,722.1
  rectangle net NetQ3_1: 544.96,656.98 642,690
  rectangle net NetQ3_1: 545.51,657.91 569.96,720.08
  rectangle net EN_3.3V: -26,492.43 4,551
  rectangle net EN_3.3V: -124.24,492.43 0,521
  rectangle net EN_3.3V: -124.24,492.43 -100.41,572.62
  rectangle net GND: -124.03,627.71 -101.21,722.5
  rectangle net BAT+: -161.43,492 -137,572.59

## Silkscreen, mask and mechanical layers (free items; w line width, h text height)
Bottom Overlay:
  text "VIBRO" at 807.92,591.48 h15 r305
  text "BAT+" at 818.79,477.38 h15 r270
  text "3V" at 692.79,415.54 h15
  text "CLK" at 769.79,414.54 h15
  text "GND" at 818.95,402.38 h15 r270
  text "G" at 685.79,265.54 h15
  text "DIO" at 768.79,265.54 h15
  text "MOSI" at 367.62,200.38 h15 r90
  text "MISO" at 398.62,200.38 h15 r90
  text "1.8V" at 178.62,190.38 h15 r90
  text "CLK" at 428.62,187.38 h15 r90
  text "INT" at 337.79,174.38 h15 r90
  text "SS" at 459.62,170.38 h15 r90
  text "3V" at 240.62,166.38 h15 r90
  text "G" at 208.79,138.54 h15
Mechanical 1:
  lines w1: 629.92,0 629.92,0
Board Outline:
  the board outline again, w5

## Text inside footprints (layer, text, board x,y; h text height)
J1: Bottom Overlay "A1" at 433.86,689.6 h15 r270; Bottom Overlay "B1" at 197.73,654.67 h15 r90
J12: Bottom Overlay "1" at 479.29,83.73 h15
SW1: Bottom Overlay "PCB EDGE" at -268,405.83 h15 r180